# Altium PCB PCB1.pcbdoc
Units mil, origin at the board's own origin, x right, y up, seen from the top; angles counter-clockwise.
Board outline 4043.02 x 4459.39 mil, 2 copper layers (Top Layer, Bottom Layer), stack 62.206 mil thick; 106 components, 60 nets, 312 pads, 238 vias.
Unrouted connection lines stored in the file: 5.
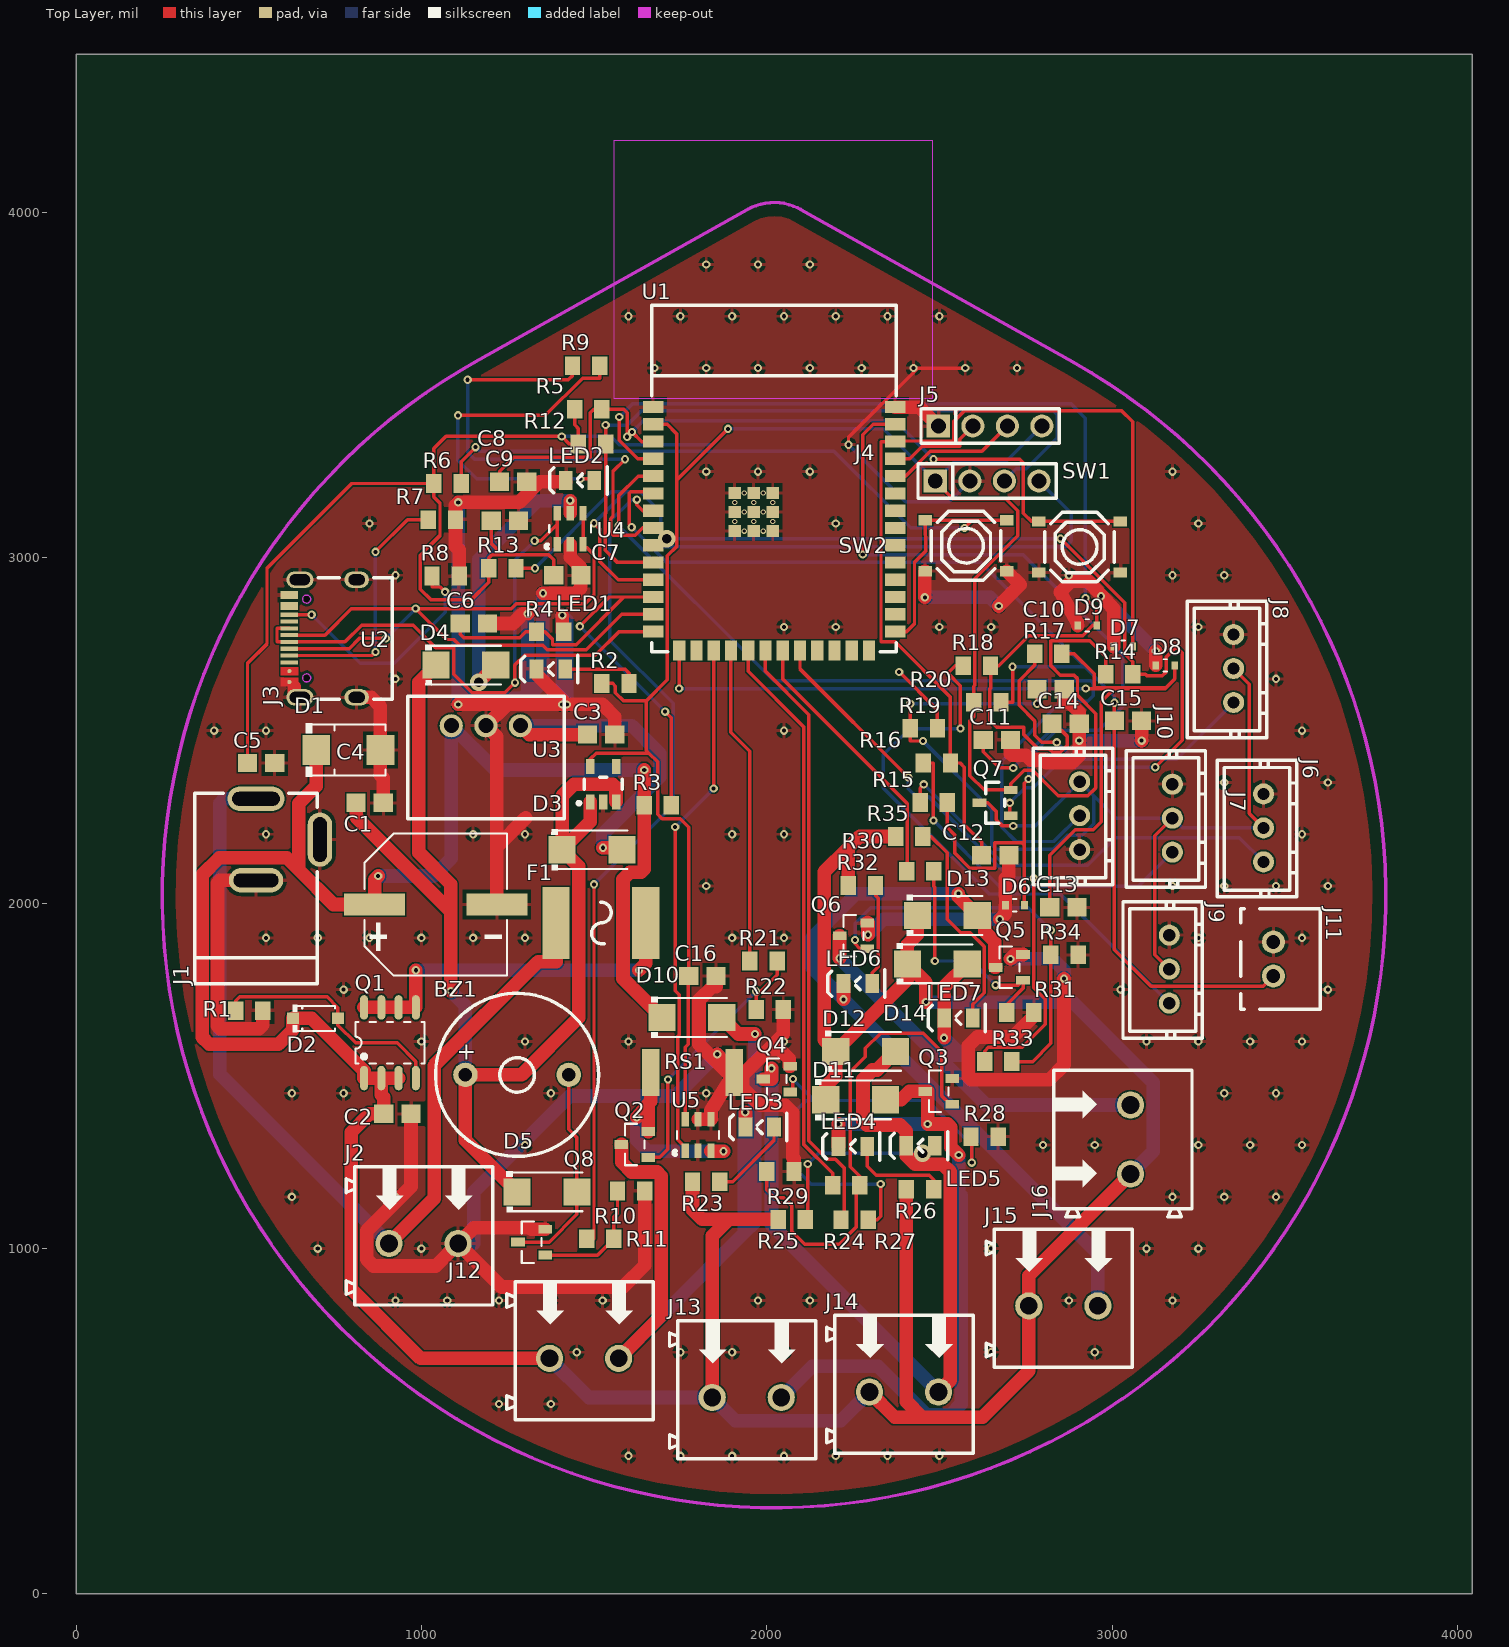
[diagram p0: Top Layer view]
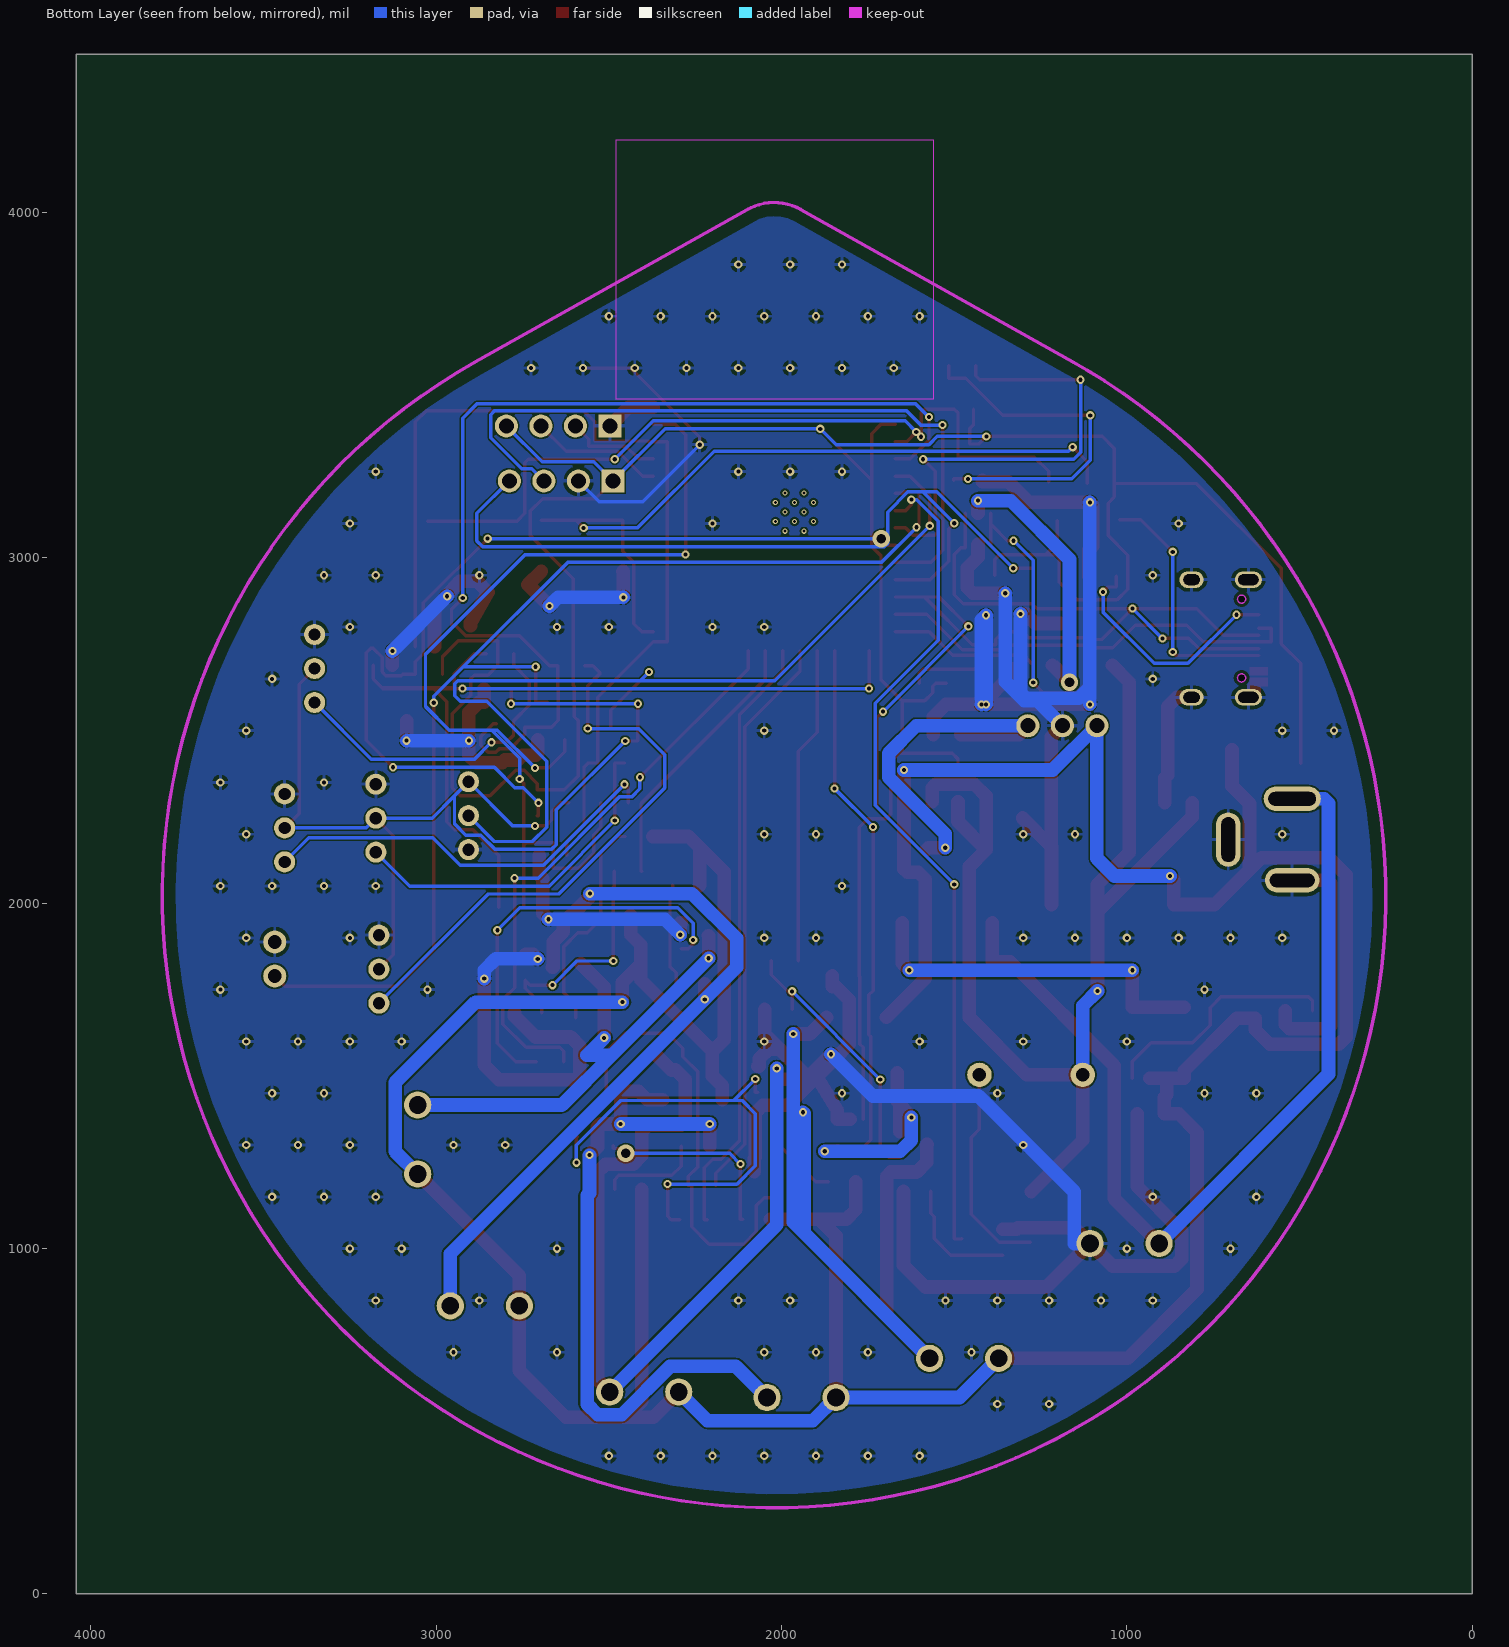
[diagram p1: Bottom Layer view, seen from below]

## Layer stack, top to bottom
Top Solder Mask Layer: solder mask 0.394, Dk 3.3
Top Layer: signal copper 1.379
Dielectric1: surface 59.449, FR4, Dk 4.5
Bottom Layer: signal copper 1.378
Bottom Solder Mask Layer: solder mask 0.394, Dk 3.3

## Board outline
4043.02,0 0,0 0,4459.39 4043.02,4459.39

## Design rules (kind name [scope] priority, off if disabled: settings)
BoardOutlineClearance copperThickness2oz_1 [All] p1 off: gap=7.99 ignorepadtopadclearanceinfootprint=FALSE except(0: Arc-SplitContinuation Track-SplitContinuation SMDPad-SplitContinuation THPad-SplitContinuation Via-SplitContinuation Fill-SplitContinuation Poly-SplitContinuation Region-SplitContinuation Text-SplitContinuation Hole-SplitContinuation; 5.98: Arc-CutoutEdge SMDPad-CutoutEdge THPad-CutoutEdge Via-CutoutEdge Fill-CutoutEdge Region-CutoutEdge Text-CutoutEdge; 6.93: Hole-OutlineEdge Hole-CutoutEdge; 10: Poly-OutlineEdge Poly-CutoutEdge; 11.81: Arc-OutlineEdge Track-OutlineEdge Track-CutoutEdge SMDPad-OutlineEdge THPad-OutlineEdge Via-OutlineEdge Fill-OutlineEdge Region-OutlineEdge Text-OutlineEdge)
BoardOutlineClearance copperThickness1oz_1 [All] p2: gap=4.02 ignorepadtopadclearanceinfootprint=FALSE except(0: Arc-SplitContinuation Track-SplitContinuation SMDPad-SplitContinuation THPad-SplitContinuation Via-SplitContinuation Fill-SplitContinuation Poly-SplitContinuation Region-SplitContinuation Text-SplitContinuation Hole-SplitContinuation; 6: SMDPad-CutoutEdge THPad-CutoutEdge Via-CutoutEdge Fill-CutoutEdge Region-CutoutEdge Text-CutoutEdge; 6.93: Hole-OutlineEdge Hole-CutoutEdge; 10: Poly-OutlineEdge Poly-CutoutEdge; 11.8: Arc-OutlineEdge Track-OutlineEdge SMDPad-OutlineEdge THPad-OutlineEdge Via-OutlineEdge Fill-OutlineEdge Region-OutlineEdge Text-OutlineEdge; 11.81: Arc-CutoutEdge Track-CutoutEdge)
Clearance ClearanceU1_ThermalVias [InComponent('U1') vs InComponent('U1')] p1: gap=1 ignorepadtopadclearanceinfootprint=TRUE
Clearance copperThickness2oz [All] p2 off: gap=5.98 ignorepadtopadclearanceinfootprint=FALSE except(6.93: Arc-Hole Track-Hole SMDPad-Hole THPad-Hole Via-Hole Fill-Hole Region-Hole Text-Hole; 7.99: Track-Track; 10: Arc-Poly Track-Poly SMDPad-Poly THPad-Poly Via-Poly Fill-Poly Poly-Poly Poly-Region Poly-Text Poly-Hole)
Clearance copperThickness1oz [All] p3: gap=5 ignorepadtopadclearanceinfootprint=TRUE
Creepage creepage [All] p1: checkdistance=0 applytopolygonpour=TRUE
DiffPairsRouting differentialPair [All] p1: maxlimit=6 minlimit=6 mostfreqgap=6 toplayer_minwidth=5 toplayer_maxwidth=100 toplayer_prefwidth=10 bottomlayer_minwidth=5 bottomlayer_maxwidth=100 bottomlayer_prefwidth=10 maxuncoupledlength=10
HoleSize [All] p1: absolutevalues=TRUE maxlimit=250 minlimit=1 maxpercent=80.000 minpercent=20.000
HoleToHoleClearance otherClearance [All] p1: gap=11.81 allowstackedmicrovias=TRUE
Length netLength [All] p1: maxlimit=0 minlimit=0
MatchedLengths netLengthTolerance [All] p1: tolerance=1000 checknetsindiffpair=FALSE checkdiffpairvsdiffpair=TRUE checkxsignals=TRUE checkothers=TRUE
MinimumSolderMaskSliver [All] p1: minsoldermaskwidth=0
PasteMaskExpansion pasteMaskExpansion [All] p1: expansion=0
PlaneConnect innerPlane [All] p1: planeconnectstyle=Relief reliefexpansion=20 reliefentries=4 reliefconductorwidth=10 reliefairgap=10
PolygonConnect copperRegion [All] p1: connectstyle=Relief reliefconductorwidth=10 reliefentries=4 polygonreliefangle="90 Angle" airgapwidth=10
RoutingVias viaSize [All] p1: holewidth=12.01 width=24.02 viastyle="Through Hole" minholewidth=11.81 minwidth=19.68 maxholewidth=248.03 maxwidth=393.7
SolderMaskExpansion solderMaskExpansion_1 [IsVia] p1: expansion=-1000 istentingtop=TRUE
SolderMaskExpansion solderMaskExpansion [All] p2: expansion=2 istentingtop=FALSE
Width copperThickness2oz_2 [All] p1 off: maxlimit=100 minlimit=8 preferedwidth=10
Width power [(InNet('+5V') OR InNet('GND') OR InNet('+12V') OR InNet('+5V_REG') OR InNet('VBUS') OR InNet('OUT_PUMP') OR InNet('OUT_V1') OR InNet('OUT_V2') OR InNet('OUT_V3') OR InNet('OUT_V4') OR InNet('VIN_RAW') OR InNet('VIN_F') OR InNet('PUMP_SRC'))] p2: maxlimit=100 minlimit=23.6 preferedwidth=39.4
Width copperThickness1oz_2 [All] p3: maxlimit=100 minlimit=5 preferedwidth=10
24 further rules are at their usual default settings.

## Components (designator, comment, footprint, x,y, rotation, side; value= is the part's Value field where it differs from the comment)
BZ1 "2.4kHz" BUZ-TH_BD12.0-P7.60-D0.6-FD 1277.3,1503.2 r0 top
C1 "470uF" CAP-SMD_BD10.0-L10.3-W10.3-LS11.0-FD 1041.71,1996.53 r0 top
C2 "10uF" C0805 930.69,1390.4 r0 top
C3 "10uF" C0805 1520.88,2488.66 r0 top
C4 "1uF" C0805 850.54,2291.1 r0 top
C5 "10uF" C0805 535.99,2406.18 r0 top
C6 "100nF" C0805 1152.07,2810.16 r0 top
C7 "10uF" C0805 1422.6,2949.81 r0 top
C8 "100nF" C0805 1241.57,3108.09 r0 top
C9 "1uF" C0805 1266.07,3220.66 r0 top
C10 "100nF" C0805 2822.49,2619.99 r0 top
C11 "100nF" C0805 2666.65,2473.12 r0 top
C12 "100nF" C0805 2661.86,2139.08 r0 top
C13 "100nF" C0805 2858.89,1988.44 r0 top
C14 "100nF" C0805 2865.92,2519.62 r0 top
C15 "100nF" C0805 3046.42,2528.3 r0 top
C16 "100nF" C0805 1813.85,1789.4 r0 top
D1 "SMBJ15A" SMB_L4.6-W3.6-LS5.3-RD 788.43,2444 r0 top
D2 "BZT52C12-WH-SOD-123" SOD-123_L2.7-W1.7-LS3.8-RD 693.36,1666.64 r0 top
D3 "SS14 SMA" SMA_L4.3-W2.6-LS5.1-RD 1494.25,2155.26 r0 top
D4 "SS14 SMA" SMA_L4.3-W2.6-LS5.1-RD 1129.05,2689.77 r0 top
D5 "SS14 SMA" SMA_L4.3-W2.6-LS5.1-RD 1363.72,1164.5 r0 top
D6 "ESD5Z3.3T1G" SOD-523_L1.2-W0.8-LS1.6-FD 2718.81,1994.42 r0 top
D7 "ESD5Z3.3T1G" SOD-523_L1.2-W0.8-LS1.6-FD 3032.62,2743.29 r0 top
D8 "ESD5Z3.3T1G" SOD-523_L1.2-W0.8-LS1.6-FD 3154.29,2689.09 r0 top
D9 "ESD5Z3.3T1G" SOD-523_L1.2-W0.8-LS1.6-FD 2928.15,2804.64 r0 top
D10 "SS34" SMA_L4.3-W2.6-LS5.2-RD 1783.17,1669.61 r0 top
D11 "SS34" SMA_L4.3-W2.6-LS5.2-RD 2257.73,1430.96 r0 top
D12 "SS34" SMA_L4.3-W2.6-LS5.2-RD 2286.7,1571.31 r0 top
D13 "SS34" SMA_L4.3-W2.6-LS5.2-RD 2522.92,1965.01 r0 top
D14 "SS34" SMA_L4.3-W2.6-LS5.2-RD 2493.95,1824.66 r0 top
F1 "BSMD2920-400-24V" F2920 1520.03,1943.17 r0 top
J1 "DC-005-5A-2.0" DC-IN-TH_DC-005-5A-2.0 613.82,2184.64 r90 top
J2 "WJ500V-5.08-2P" CONN-TH_2P-P5.00_WJ500V-5.08-2P 1006.51,1014.9 r0 top
J3 "TYPE-C-31-M-12" USB-C_SMD-TYPE-C-31-M-12_1 715.31,2766.8 r90 top
J4 "PZ254V-11-04P" HDR-TH_4P-P2.54-V-M 2638.17,3222.93 r0 top
J5 "PZ254V-11-04P" HDR-TH_4P-P2.54-V-M 2646.92,3382.26 r0 top
J6 "B3B-XH-A(LF)(SN)" CONN-TH_3P-P2.50_A2501WV2-3P 3438.83,2218.36 r270 top
J7 "B3B-XH-A(LF)(SN)" CONN-TH_3P-P2.50_A2501WV2-3P 3174.76,2246.51 r270 top
J8 "B3B-XH-A(LF)(SN)" CONN-TH_3P-P2.50_A2501WV2-3P 3352.06,2679.83 r270 top
J9 "B3B-XH-A(LF)(SN)" CONN-TH_3P-P2.50_A2501WV2-3P 3165.88,1809.34 r270 top
J10 "B3B-XH-A(LF)(SN)" CONN-TH_3P-P2.50_A2501WV2-3P 2906.33,2253.74 r270 top
J11 "B2B-XH-A(LF)(SN)" CONN-TH_B2B-XH-A-LF-SN 3467.45,1838.75 r270 top
J12 "WJ500V-5.08-2P" CONN-TH_2P-P5.00_WJ500V-5.08-2P 1471.36,682.24 r0 top
J13 "WJ500V-5.08-2P" CONN-TH_2P-P5.00_WJ500V-5.08-2P 1942.19,569.15 r0 top
J14 "WJ500V-5.08-2P" CONN-TH_2P-P5.00_WJ500V-5.08-2P 2397.67,585.05 r0 top
J15 "WJ500V-5.08-2P" CONN-TH_2P-P5.00_WJ500V-5.08-2P 2859.1,834.3 r0 top
J16 "WJ500V-5.08-2P" CONN-TH_2P-P5.00_WJ500V-5.08-2P 3053.58,1316.11 r90 top
LED1 "KT-0805G" LED0805-R-RD 1374.9,2678.51 r0 top
LED2 "KT-0805G" LED0805-R-RD 1459.93,3224.85 r0 top
LED3 "KT-0805G" LED0805-R-RD 1979.89,1351.88 r0 top
LED4 "KT-0805G" LED0805-R-RD 2249.38,1296.26 r0 top
LED5 "KT-0805G" LED0805-R-RD 2445.92,1298.02 r0 top
LED6 "KT-0805G" LED0805-R-RD 2263.9,1767.54 r0 top
LED7 "KT-0805G" LED0805-R-RD 2555.03,1667.95 r0 top
Q1 "AO4407A" SOIC-8_L4.9-W3.9-P1.27-LS6.0-BL 909.03,1596.16 r0 top
Q2 "AO3400A" SOT-23-3_L2.9-W1.3-P1.90-LS2.4-BR 1618.02,1301.56 r0 top
Q3 "AO3400A" SOT-23-3_L2.9-W1.3-P1.90-LS2.4-BR 2498.37,1455.54 r0 top
Q4 "AO3400A" SOT-23-3_L2.9-W1.3-P1.90-LS2.4-BR 2029.25,1490.92 r0 top
Q5 "AO3400A" SOT-23-3_L2.9-W1.3-P1.90-LS2.4-BR 2702.96,1814.48 r0 top
Q6 "AO3400A" SOT-23-3_L2.9-W1.3-P1.90-LS2.4-BR 2251.28,1905.89 r0 top
Q7 "AO3401A" SOT-23_L2.9-W1.3-P1.90-LS2.4-BR 2661.57,2291.1 r0 top
Q8 "AO3400A" SOT-23-3_L2.9-W1.3-P1.90-LS2.4-BR 1319.33,1018.89 r0 top
R1 "10kΩ" R0805 501.78,1689.04 r0 top
R2 "1kΩ" R0805 1562.06,2636.85 r0 top
R3 "100kΩ" R0805 1684.81,2283.67 r0 top
R4 "22kΩ" R0805 1372.72,2786.37 r0 top
R5 "10kΩ" R0805 1483.48,3431.03 r0 top
R6 "10kΩ" R0805 1075.78,3215.75 r0 top
R7 "5.1kΩ" R0805 1059.43,3110.84 r0 top
R8 "5.1kΩ" R0805 1070.33,2947.59 r0 top
R9 "1kΩ" R0805 1477.06,3556.74 r0 top
R10 "100Ω" R0805 1517.95,1028.33 r0 top
R11 "100kΩ" R0805 1607.37,1166.65 r0 top
R12 "4.7kΩ" R0805 1494.25,3330.1 r0 top
R13 "4.7kΩ" R0805 1234.69,2970.41 r0 top
R14 "100kΩ" R0805 3021.13,2663.28 r0 top
R15 "1kΩ" R0805 2483.78,2291.73 r0 top
R16 "1kΩ" R0805 2492.86,2406.32 r0 top
R17 "1kΩ" R0805 2815.39,2722.74 r0 top
R18 "1kΩ" R0805 2608.85,2688.04 r0 top
R19 "4.7kΩ" R0805 2455.19,2506.7 r0 top
R20 "10kΩ" R0805 2639.22,2582.18 r0 top
R21 "100Ω" R0805 1990.91,1833.09 r0 top
R22 "100kΩ" R0805 2008.66,1692.5 r0 top
R23 "10kΩ" R0805 1824.59,1194.12 r0 top
R24 "100Ω" R0805 2230.24,1183.48 r0 top
R25 "100kΩ" R0805 2039.69,1223.27 r0 top
R26 "10kΩ" R0805 2443.88,1172.36 r0 top
R27 "100Ω" R0805 2254.66,1083.82 r0 top
R28 "100kΩ" R0805 2630.99,1324.13 r0 top
R29 "10kΩ" R0805 2072.52,1084.66 r0 top
R30 "100Ω" R0805 2444.74,2092.95 r0 top
R31 "100kΩ" R0805 2734.01,1683.69 r0 top
R32 "10kΩ" R0805 2275.72,2051.76 r0 top
R33 "100Ω" R0805 2670.4,1541.68 r0 top
R34 "100kΩ" R0805 2862.35,1850.79 r0 top
R35 "10kΩ" R0805 2412.71,2193.44 r0 top
RS1 "20mΩ" R2512 1785.29,1509.7 r0 top
SW1 "TS-1187A-B-A-B" SW-SMD_4P-L5.1-W5.1-P3.70-LS6.5-TL_H1.5 2906.27,3031.95 r0 top
SW2 "TS-1187A-B-A-B" SW-SMD_4P-L5.1-W5.1-P3.70-LS6.5-TL_H1.5 2577.26,3035.58 r0 top
U1 "2.4GHz" WIFIM-SMD_ESP32-S3-WROOM-1-N8 2021.51,3084.5 r0 top
U2 "K7805-1000R3" PWRM-TH_K78XX-2000 1186.69,2514.3 r0 top
U3 "AP2112K-3.3TRG1" SOT-25-5_L2.9-W1.6-P0.95-LS2.8-BL 1526.41,2345.06 r0 top
U4 "USBLC6-2SC6" SOT-23-6_L2.9-W1.6-P0.95-LS2.8-BL 1430.96,3084.5 r0 top
U5 "INA181A2IDBVR" SOT-23-6_L2.9-W1.6-P0.95-LS2.8-BL 1801.33,1328.92 r0 top

## Footprints (in the part's own frame and the unit in brackets; to place one, negate y for a bottom-side part, rotate by r counter-clockwise, add the part's x,y. Pads: shape width x height; smd on the part's side, far side on the other; paste and mask are expansions set on the pad)
BUZ-TH_BD12.0-P7.60-D0.6-FD [mm]
  round 1.8 hole 1: 1(-3.8,0) 2(3.8,0)
  silkscreen extent -6,-6 6,6
C0805 [mm]
  rect 1.41x1.35 smd paste-100 mask+0.051: 1(-1,0) 2(1,0)
CAP-SMD_BD10.0-L10.3-W10.3-LS11.0-FD [mm]
  rect 4.5x1.65 smd: 1(-4.5,0) 2(4.5,0)
  silkscreen extent -5.23,-5.23 5.23,5.23
CONN-TH_2P-P5.00_WJ500V-5.08-2P [mm]
  round 2 hole 1.3: 1(-2.54,0) 2(2.54,0)
  silkscreen extent -5.68,-4.52 5.08,5.64
CONN-TH_3P-P2.50_A2501WV2-3P [mm]
  round 1.55 hole 0.9: 1(-2.5,0) 2(0,0) 3(2.5,0)
  silkscreen extent -4.97,-3.4 5.08,2.44
CONN-TH_B2B-XH-A-LF-SN [mm]
  round 1.7 hole 1: 1(1.25,0) 2(-1.25,0)
  silkscreen extent -3.68,-2.41 3.68,3.43
DC-IN-TH_DC-005-5A-2.0 [mm]
  oval 1.8x4.2 hole 1 slot 3.5 at 90 deg: 1(3,2.352)
  oval 1.8x4 hole 1 slot 3.3 at 90 deg: 2(-3,2.352)
  oval 4x1.8 hole 1 slot 3.3 at 0 deg: 3(0,-2.352)
  silkscreen extent -10.6,-2.15 3.4,6.85
F2920 [mm]
  rect 2x5.3 smd: 1(-3.3,0) 2(3.3,0)
  silkscreen extent -0.69,-1.54 0.76,1.52
HDR-TH_4P-P2.54-V-M [mm]
  rect 1.7x1.7 hole 1.1: 1(-3.81,0)
  round 1.7 hole 1.1: 2(-1.27,0) 3(1.27,0) 4(3.81,0)
  silkscreen extent -5.08,-1.27 5.08,1.27
LED0805-R-RD [mm]
  rect 1x1.4 smd: 1(1.05,0) 2(-1.05,0)
  silkscreen extent -2.22,-1.02 1.99,1.01
PWRM-TH_K78XX-2000 [mm]
  round 1.7 hole 1.1: 1(-2.54,0) 2(0,0) 3(2.54,0)
  silkscreen extent -5.74,-6.86 5.77,2.16
R0805 [mm]
  rect 1.133x1.377 smd paste-100 mask+0.051: 1(-1,0) 2(1,0)
R2512 [mil]
  rect 50.49x136.06 smd paste-3937.01 mask+2: 1(-120.72,0) 2(120.72,0)
SMA_L4.3-W2.6-LS5.1-RD [mm]
  rect 2x2 smd: 1(-2.2,0) 2(2.2,0)
  silkscreen extent -2.98,-1.5 2.6,1.5
SMA_L4.3-W2.6-LS5.2-RD [mm]
  rect 2x2 smd: 1(-2.2,0) 2(2.2,0)
  silkscreen extent -2.98,-1.5 2.6,1.5
SMB_L4.6-W3.6-LS5.3-RD [mil]
  rect 80.61x86.31 smd: 1(-92.94,0) 2(92.94,0)
  silkscreen extent -123,-77 108,77
SOD-123_L2.7-W1.7-LS3.8-RD [mm]
  rect 0.91x0.84 smd: 1(-1.655,0) 2(1.655,0)
  silkscreen extent -1.65,-1 1.43,1
SOD-523_L1.2-W0.8-LS1.6-FD [mm]
  rect 0.5x0.6 smd: 1(-0.7,0) 2(0.7,0)
  silkscreen extent -0.13,-0.45 0.13,0.45
SOIC-8_L4.9-W3.9-P1.27-LS6.0-BL [mm]
  oval 0.588x1.8 smd paste+0 mask+0.051: 1(-1.905,-2.6) 2(-0.635,-2.6) 3(0.635,-2.6) 4(1.905,-2.6) 5(1.905,2.6) 6(0.635,2.6) 7(-0.635,2.6) 8(-1.905,2.6)
  silkscreen extent -2.53,-1.52 2.53,1.52
SOT-23-3_L2.9-W1.3-P1.90-LS2.4-BR [mm]
  rect 1x0.65 smd: 1(1,-0.95) 2(1,0.95) 3(-1,0)
  silkscreen extent -0.73,-1.53 0.73,1.53
SOT-23-6_L2.9-W1.6-P0.95-LS2.8-BL [mil]
  rect 20.95x42.2 smd: 1(-37.4,-45.24) 2(0,-45.24) 3(37.4,-45.24) 4(37.4,45.24) 5(0,45.24) 6(-37.4,45.24)
  silkscreen extent -72,-57 61,11
SOT-23_L2.9-W1.3-P1.90-LS2.4-BR [mm]
  rect 1x0.6 smd paste+0 mask+0.051: 1(1.15,-0.95) 2(1.15,0.95) 3(-1.15,0)
  silkscreen extent -0.7,-1.5 0.7,1.5
SOT-25-5_L2.9-W1.6-P0.95-LS2.8-BL [mil]
  rect 24.5x43.5 smd: 1(-37.39,-51.18) 2(-0.02,-51.18) 3(37.39,-51.18) 4(37.39,51.18) 5(-37.39,51.18)
  silkscreen extent -75,-60 56,20
SW-SMD_4P-L5.1-W5.1-P3.70-LS6.5-TL_H1.5 [mm]
  rect 1x0.75 smd: 1(-3,1.875) 2(3,1.875) 3(-3,-1.875) 4(3,-1.875)
  silkscreen extent -2.55,-2.55 2.55,2.55
USB-C_SMD-TYPE-C-31-M-12_1 [mm]
  oval 1.2x2 hole 0.8 slot 1.5 at 90 deg paste-2539.97 mask+0.051: 1(4.325,1.706) 4(-4.325,1.706)
  oval 1.2x1.8 hole 0.8 slot 1.2 at 90 deg copper offset 0,0 paste-2539.97 mask+0.051: 2(4.325,-2.474) 3(-4.325,-2.474)
  round 0.3 smd: A1B12(-3.2,2.474) A4B9(-2.4,2.474)
  rect 0.3x1.3 smd paste-100 mask+0.051: A5(-1.25,2.474) A6(-0.25,2.474) A7(0.25,2.474) A8(1.25,2.474) B5(1.75,2.474) B6(0.75,2.474) B7(-0.75,2.474) B8(-1.75,2.474)
  rect 0.6x1.3 smd paste-100 mask+0.051: B1A12(3.2,2.474) B4A9(2.4,2.474)
  Top Layer region: -2.9,1.824 -2.9,3.124 -3.2,3.124 -3.2,3.124 -3.5,3.124 -3.5,1.824 -3.2,1.824 -3.2,1.824 -2.9,1.824
  Top Layer region: -2.1,1.824 -2.1,3.124 -2.4,3.124 -2.4,3.124 -2.7,3.124 -2.7,1.824 -2.4,1.824 -2.4,1.824 -2.1,1.824
  Board Outline Layer board cut-out: -2.9,0.906 -3.03,0.935 -3.134,1.019 -3.192,1.139 -3.192,1.272 -3.134,1.393 -3.03,1.476 -2.9,1.506 -2.9,1.506 -2.77,1.476 -2.665,1.393 -2.607,1.272 -2.607,1.139 -2.665,1.019 -2.77,0.935 -2.9,0.906 -2.9,0.906
  Board Outline Layer board cut-out: 2.9,0.906 2.77,0.935 2.665,1.019 2.607,1.139 2.607,1.272 2.665,1.393 2.77,1.476 2.9,1.506 2.9,1.506 3.03,1.476 3.134,1.393 3.192,1.272 3.192,1.139 3.134,1.019 3.03,0.935 2.9,0.906 2.9,0.906
  Board Outline Layer circle w0.003: c-2.9,1.206 r0.3
  Board Outline Layer circle w0.003: c2.9,1.206 r0.3
  Board Outline Layer region: -2.9,0.906 -3.03,0.935 -3.134,1.019 -3.192,1.139 -3.192,1.272 -3.134,1.393 -3.03,1.476 -2.9,1.506 -2.9,1.506 -2.77,1.476 -2.665,1.393 -2.607,1.272 -2.607,1.139 -2.665,1.019 -2.77,0.935 -2.9,0.906 -2.9,0.906
  Board Outline Layer region: 2.9,0.906 2.77,0.935 2.665,1.019 2.607,1.139 2.607,1.272 2.665,1.393 2.77,1.476 2.9,1.506 2.9,1.506 3.03,1.476 3.134,1.393 3.192,1.272 3.192,1.139 3.134,1.019 3.03,0.935 2.9,0.906 2.9,0.906
  Board Outline Layer region: -2.9,0.906 -2.972,0.914 -3.039,0.94 -3.099,0.981 -3.147,1.035 -3.18,1.099 -3.198,1.169 -3.198,1.242 -3.18,1.312 -3.147,1.376 -3.099,1.43 -3.039,1.471 -2.972,1.497 -2.9,1.506 -2.828,1.497 -2.761,1.471 -2.701,1.43 -2.653,1.376 -2.619,1.312 -2.602,1.242 -2.602,1.169 -2.619,1.099 -2.653,1.035 -2.701,0.981 -2.761,0.94 -2.828,0.914 -2.9,0.906
  Board Outline Layer region: 2.9,0.906 2.828,0.914 2.761,0.94 2.701,0.981 2.653,1.035 2.619,1.099 2.602,1.169 2.602,1.242 2.619,1.312 2.653,1.376 2.701,1.43 2.761,1.471 2.828,1.497 2.9,1.506 2.972,1.497 3.039,1.471 3.099,1.43 3.147,1.376 3.18,1.312 3.198,1.242 3.198,1.169 3.18,1.099 3.147,1.035 3.099,0.981 3.039,0.94 2.972,0.914 2.9,0.906
  silkscreen extent -4.47,-5.09 4.47,0.34
WIFIM-SMD_ESP32-S3-WROOM-1-N8 [mm]
  rect 1.5x0.9 smd paste+0 mask+0.05: 1(-8.9,8.955) 2(-8.9,7.685) 3(-8.9,6.415) 4(-8.9,5.145) 5(-8.9,3.875) 6(-8.9,2.605) 7(-8.9,1.335) 8(-8.9,0.065) 9(-8.9,-1.205) 10(-8.9,-2.475) 11(-8.9,-3.745) 12(-8.9,-5.015) 13(-8.9,-6.285) 14(-8.9,-7.555) 27(8.9,-7.555) 28(8.9,-6.285) 29(8.9,-5.015) 30(8.9,-3.745) 31(8.9,-2.475) 32(8.9,-1.205) 33(8.9,0.065) 34(8.9,1.335) 35(8.9,2.605) 36(8.9,3.875) 37(8.9,5.145) 38(8.9,6.415) 39(8.9,7.685) 40(8.9,8.955)
  rect 0.9x1.5 smd paste+0 mask+0.05: 15(-6.985,-8.955) 16(-5.715,-8.955) 17(-4.445,-8.955) 18(-3.175,-8.955) 19(-1.905,-8.955) 20(-0.635,-8.955) 21(0.635,-8.955) 22(1.905,-8.955) 23(3.175,-8.955) 24(4.445,-8.955) 25(5.715,-8.955) 26(6.985,-8.955)
  rect 0.9x0.9 smd: 41(-2.9,-0.165) 41(-2.9,1.235) 41(-2.9,2.635) 41(-1.499,-0.165) 41(-1.499,1.235) 41(-1.499,2.635) 41(-0.099,-0.165) 41(-0.099,1.235) 41(-0.099,2.635)
  silkscreen extent -9,-9.05 9,16.45

## Via types
v1: diameter 24, hole 12, Top Layer to Bottom Layer, tented both sides, 120 vias
v2: diameter 24.02, hole 12.01, Top Layer to Bottom Layer, tented both sides, 103 vias
v3: diameter 15.75, hole 9.8, Top Layer to Bottom Layer, tented both sides, 12 vias
v4: diameter 50, hole 28, Top Layer to Bottom Layer, tented both sides, 3 vias

## Nets (pads, with @x,y where several pads share a name; then routed paths per layer and width w, separated by ;. In a path a pad name is that pad's centre, name@x,y a point inside that pad or via, vN(x,y) a via of type N, cw(c..) or ccw(c..) an arc to the next point about the centre after c; other vN are vias at no path point)
+3V3: C5.1 C7.1 C8.1 C16.1 J4.1 J5.4 Q7.2 R2.1 R5.1 R6.1 R12.1 R13.1 R14.1 R20.1 U1.2 U3.5 U5.6 | length 9410.3
  Top Layer w10: C5.1 496.62,2694.62 553,2751 553,2970 798.75,3215.75 R6.1 ; C8.1 1202.2,3042 1234.2,3010 ; C7.1 1383.23,2994.77 1368,3010 1234.2,3010 ; R5.1 1444.11,3385.77 1454.88,3375 R12.1 1428.69,3330.1 v2(1406.79,3352) 1071.41,3352 1036.41,3317 R6.1 ; U3.5 1489.02,2418.02 1506,2435 1659,2435 ; R2.1 1554,2636.85 1562,2628.85 1562,2610 1586,2586 1651,2586 ; U1.2 1712,3387.05 1738.99,3360.05 1738.99,3224.99 ; U5.6 1763.93,1583 1773,1592.07 1773,1789.4 C16.1 1774.48,2220.52 1750,2245 1697,2245 1684,2258 1684,2410 1659,2435 ; v2(1888,3374) 1738.99,3224.99 ; J4.1 2539.1,3172 2692,3172 2727,3137 2727,3064 2603,2940 2603,2631 2599.85,2627.85 R20.1 2599.85,2540.85 2588,2529 2588,2370 2629.5,2328.5 Q7.2 2706.84,2346.84 2745.3,2385.3 2770,2385.3 2844.3,2311 2930,2311 2953,2334 2953,2549 2900,2602 2900,2651 2890,2661 2850,2661 2822,2689 2822,2759.85 2935.91,2759.85 2981.76,2714 R14.1 ; R6.1 1036.41,3176.59 1054,3159 1054,3065 997,3008 997,2910 1028.54,2878.46 1143.78,2878.46 1195.32,2930 R13.1 1195.32,3000 1205.32,3010 1234.2,3010 ; 1651,2586 1651,2443 1659,2435 ; 1651,2586 1712,2647 1712,3006.01 1738.99,3033.01 1738.99,3224.99
  Bottom Layer w10: v2(1406.79,3352) 1549.01,3352 1573,3328.01 1842.01,3328.01 v2(1888,3374) 2337.1,3374 J4.1 2543.4,3278.17 2692.83,3278.17 J5.4
+3V3_SENS: C10.1 J6.2 J7.2 J8.2 J9.2 J10.1 Q7.3 R19.1 | length 3295.5
  Top Layer w10: v2(2415.82,2578) R19.1 2415.82,2470 v2(2452.7,2470) ; Q7.3 2639.91,2291.09 2665,2266 2665,2242 2683,2224 v2(2714,2224) ; v2(2783.12,2578) C10.1 ; J9.2 3124,1851.21 3124,2195.73 J7.2 ; J8.2 3397,2634.88 3397,2260.18 J6.2
  Bottom Layer w10: v2(2415.82,2578) v2(2783.12,2578) ; v2(2452.7,2470) 2652,2270.7 2652,2170 2666,2156 2829.81,2156 2870.81,2197 2914,2197 2947,2230 2947,2311.49 ; v2(2714,2224) 2778.17,2224 J10.1 2947,2311.49 ; J6.2 3202.91,2218.35 J7.2 3011.99,2246.5 2947,2311.49
+5V: BZ1.1 C4.1 D3.1 D4.1 D5.1 U3.1 U3.3 | length 3538.4
  Top Layer w39.4: C4.1 811.17,2250 1085,1976.17 ; D4.1 993,2640.33 993,2147 1085,2055 1085,1976.17 ; v2(1085,1746) 1085,1976.17 ; D5.1 1127.69,1313.92 BZ1.1 1290,1503.2 1456,1669.2 1456,2106.9 D3.1 ; U3.1 1489.02,2236.64 D3.1 ; U3.3 1563.8,2335.2 1554,2345 1442,2345 1407.63,2310.63 D3.1
  Bottom Layer w39.4: v2(1085,1746) 1127.69,1703.31 BZ1.1
+5V_REG: C3.1 D3.2 U2.3 | length 1040.2
  Top Layer w39.4: U2.3 1312.33,2488.66 C3.1 ; v2(1526,2161.04) 1575.08,2161.04 D3.2
  Bottom Layer w39.4: U2.3 1609.7,2514.3 1690,2434 1690,2365 1526,2201 v2(1526,2161.04)
+12V: C1.1 C2.1 D1.1 D2.1 D10.1 D11.1 D12.1 D13.1 D14.1 J12.1 J13.1 J14.1 J15.1 J16.1 Q1.1 Q1.2 Q1.3 R3.1 R23.1 R26.1 R29.1 R32.1 R35.1 U2.1 | length 12128.1
  Top Layer w39.4: D1.1 695.49,2339.49 645,2289 645,2097 ; v2(875,2079) 864.55,2068.55 C1.1 745.47,1996.53 645,2097 ; Q1.3 Q1.2 ; J12.1 997.76,682.24 797,883 797,1337.4 850,1390.4 C2.1 891.32,1438 884.03,1445.29 Q1.2 ; v2(1645.44,2386) R3.1 1645.44,2099.44 1636,2090 1604,2090 1584,2070 1584,1782.16 D10.1 ; R23.1 1785.22,1112.78 1813.34,1084.66 1890,1084.66 ; J13.1 1842.19,1036.85 1890,1084.66 ; R29.1 1890,1084.66 ; D11.1 2171.12,1471.03 2200.09,1500 D12.1 ; R32.1 2236.35,2160.79 ; J14.1 2370.72,512 2450,512 ; R35.1 2269,2193.44 2236.35,2160.79 ; R26.1 2404.51,557.49 2450,512 ; D13.1 2436.31,1908.97 2407.34,1880 D14.1 ; v2(2461,1714) 2461,1771 D14.1 ; J16.1 2759.1,921.63 J15.1 2759.1,646.1 2625,512 2450,512 ; 645,2097 610,2132 415,2132 365,2082 365,1613 386,1592 586.2,1592 628.2,1634 D2.1 682.39,1666.64 834.03,1515 Q1.1 Q1.2 ; D12.1 2166.24,1605.16 2166.24,2090.68 2236.35,2160.79 ; D12.1 2407.34,1778.56 D14.1
  Bottom Layer w39.4: v2(875,2079) 1035.69,2079 1086.69,2130 U2.1 1214.99,2386 v2(1645.44,2386) ; J12.1 1484.46,569.15 J13.1 1909.34,502 2214.62,502 J14.1 ; v2(2461,1714) 2886,1714 3119,1481 3119,1281.53 J16.1
BOOT: R6.2 SW2.1 SW2.2 U1.27 | length 2281.7
  Top Layer w10: R6.2 1115.15,3279.15 v2(1157,3321) ; U1.27 2405.05,2787.05 2428,2810 2428,2988 2460,3020 SW2.1 2595.39,3109.39 ; v2(2573,3087) 2595.39,3109.39 ; SW2.2 2595.39,3109.39
  Bottom Layer w10: v2(1157,3321) 1169,3309 2195,3309 2417,3087 v2(2573,3087)
BTN_MODE: C15.1 J11.1 R20.2 U1.6 | length 3373.4
  Top Layer w10: v2(1609,3089) 1601.99,3096.01 1601.99,3187.05 1606.73,3191.78 1646.6,3191.78 1646.6,3187.05 U1.6 ; R20.2 2712,2582.18 v2(2712,2685) ; v2(3007,2581) 3007.05,2580.95 C15.1 3007.05,1865.95 3113,1760 3437.91,1760 J11.1
  Bottom Layer w10: v2(1609,3089) 1711,2987 2619.53,2987 2921.53,2685 ; v2(2712,2685) 2921.53,2685 ; v2(3007,2581) 3007,2599.53 2921.53,2685
BUZ_CTRL: R10.1 U1.7 | length 2443.7
  Top Layer w10: R10.1 1478.58,1028 1500,1028 v2(1500,2055) ; v2(1624,3169) 1624,3154 1640.95,3137.05 U1.7
  Bottom Layer w10: v2(1500,2055) 1729,2284 1729,2579 1546,2762 1546,3106 1609,3169 v2(1624,3169)
BUZ_G: Q8.1 R10.2 R11.1 | length 360.8
  Top Layer w10: Q8.1 1510.16,981.49 1557,1028.33 R10.2 1557.32,1092 1568,1102.68 R11.1
BUZ_N: BZ1.2 D5.2 Q8.3 | length 617.3
  Top Layer w10: Q8.3 1370,1018.89 1450.34,1099.23 D5.2 1450.34,1322 1426.9,1345.43 BZ1.2
CC1: J3.A5 R7.1 | length 734.8
  Top Layer w10: J3.A5 856.59,2717.59 v2(867,2728) ; v2(867,3017.84) 960,3110.84 R7.1
  Bottom Layer w10: v2(867,2728) v2(867,3017.84)
CC2: J3.B5 R8.1 | length 705.1
  Top Layer w10: J3.B5 v2(682.3,2835.7) ; R8.1 1030.96,2916 1055,2916 v2(1069,2902)
  Bottom Layer w10: v2(682.3,2835.7) 822.99,2695.01 921.01,2695.01 1069,2843 v2(1069,2902)
DHT_DATA: J10.2 R19.2 U1.5 | length 2865.6
  Top Layer w10: v2(1570.99,3093) 1570.99,3180.05 1627.99,3237.05 U1.5 ; v2(2383.56,2670) 2494.56,2559 R19.2
  Bottom Layer w10: v2(1570.99,3093) 2019.98,2644.01 2409.56,2644.01 ; v2(2383.56,2670) 2409.56,2644.01 ; J10.2 2831.62,2179.02 2722,2179.02 2680.3,2220.72 2680.3,2411.98 2853.34,2585.02 2930,2585.02 2946.01,2601.02 2946.01,2636 2938,2644.01 2409.56,2644.01
EN: C9.1 R5.2 SW1.1 SW1.2 U1.3 | length 2349.4
  Top Layer w10: C9.1 1226.71,3250.71 1268,3292 1489,3292 1489,3420.03 1500,3431.03 R5.2 1585.8,3431.03 1596,3420.83 v2(1596,3351) ; v2(1609.95,3364.95) 1637.86,3337.05 U1.3 ; v2(2483,3286) 2733,3286 2743,3276 2743,3130 2767.23,3105.77 SW1.1 SW1.2
  Bottom Layer w10: v2(1596,3351) v2(1609.95,3364.95) 1642,3397 2372,3397 v2(2483,3286)
G_PUMP: Q2.1 R21.2 R22.1 | length 808
  Top Layer w10: Q2.1 1690,1264.16 1714,1288.16 v2(1714,1489.71) ; R22.1 1969.29,1732 ; v2(1969.29,1745) 1969.29,1732 ; R21.2 2030.28,1792.99 1969.29,1732
  Bottom Layer w10: v2(1714,1489.71) v2(1969.29,1745)
G_V1: Q3.1 R24.2 R25.1 | length 1429
  Top Layer w10: R25.1 2000.32,1170 2022.32,1148 2050,1148 2073,1125 2073,1050 2110,1013 2210,1013 2260,1063 2260,1183.48 R24.2 2269.61,1209.39 2242,1237 2242,1512 2286,1556 2286,1580 2330,1624 2453,1624 2507,1570 2507,1442.14 2531,1418.14 Q3.1
G_V2: Q4.1 R27.2 R28.1 | length 1408.5
  Top Layer w10: Q4.1 2076,1453.52 v2(2076,1491) ; R27.2 2320,1083.82 2330,1093.82 v2(2330,1187) ; R28.1 2594,1324.13 v2(2594,1249)
  Bottom Layer w10: v2(2076,1491) 2138,1429 ; v2(2330,1187) 2129,1187 2076,1240 2076,1391 2114,1429 2138,1429 ; v2(2594,1249) 2594,1300 2465,1429 2138,1429
G_V3: Q5.1 R30.2 R31.1 | length 664.4
  Top Layer w10: R30.2 2484.11,2049.89 2487,2047 v2(2487,1833) ; v2(2663,1763) 2728.25,1763 Q5.1 2742.33,1753.69 2694.64,1706 R31.1
  Bottom Layer w10: v2(2487,1833) 2593,1833 v2(2663,1763)
G_V4: Q6.1 R33.2 R34.1 | length 1175
  Top Layer w10: v2(2256,1894) 2256,1882.49 2270,1868.49 Q6.1 ; R33.2 2770,1541.68 2822.98,1594.66 R34.1 v2(2822.98,1922.02)
  Bottom Layer w10: v2(2256,1894) 2256,1942 2301,1987 2758,1987 v2(2822.98,1922.02)
GND: C1.2 C2.2 C3.2 C4.2 C5.2 C6.2 C7.2 C8.2 C9.2 C10.2 C11.2 C12.2 C13.2 C14.2 C15.2 C16.2 D1.2 D6.1 D7.1 D8.1 D9.1 J1.2 J1.3 J2.2 J3.1 J3.2 J3.3 J3.4 J3.A1B12 J3.B1A12 J4.2 J5.1 J6.1 J7.1 J8.1 J9.1 J10.3 J11.2 LED1.2 LED2.2 Q3.2 Q4.2 Q5.2 Q6.2 Q8.2 R1.2 R4.2 R7.2 R8.2 R11.2 R22.2 R25.2 R28.2 R31.2 R34.2 RS1.2 SW1.3 SW1.4 SW2.3 SW2.4 U1.1 U1.40 U1.41 U2.2 U3.2 U4.2 U5.2 U5.4 U5.5 | length 14650.4
  Top Layer w10: v2(2237,3328) 2237,3350 2437,3550 v1(2575,3550)
  Top Layer w39.4: J1.2 418,2066.53 409.87,2058.4 409.87,1645.13 418,1637 530,1637 541.15,1648.15 R1.2 ; 632,2626.71 632,2596.52 J3.4 ; J3.3 854.85,2596.52 881.37,2570 D1.2 881.37,2371.55 889.91,2363 C4.2 ; C2.2 970.06,1180.01 841.46,1051.41 841.46,970 861.62,949.84 1041.46,949.84 J2.2 ; v2(1107,2576) 1248.39,2576 ; R8.2 1109.7,3023 1098.8,3033.9 R7.2 1098.8,3152.8 v2(1107,3161) 1283,3161 1343,3221 1418.58,3221 LED2.2 ; C6.2 1265.17,2810.17 1293.18,2838.18 v2(1308,2838.18) ; 1302,2247 1218.88,2163.88 ; LED1.2 1333.55,2663.45 v2(1421,2576) 1524.25,2576 1560.25,2540 C3.2 ; v2(1352,2898) 1445.97,2898 1461.97,2914 C7.2 ; Q8.2 1319,1056.29 1315.29,1060 1151.62,1060 J2.2 ; v2(1408,2576) 1248.39,2576 ; v2(1408,2834) 1408,2786.37 R4.2 ; U4.2 1430.96,3002 1462,2970.96 C7.2 ; R11.2 1646.74,951.74 1584,889 1232.41,889 J2.2 ; U5.5 U5.4 1838.73,1400.29 RS1.2@1898.51,1497.49 ; C16.2 1853.22,1758.22 1842.22,1758.22 1804,1720 1804,1592 1845.01,1551 1896.16,1499.84 RS1.2@1898.51,1497.49 ; v2(1857.01,1563) 1906.01,1514 RS1.2 RS1.2@1898.51,1497.49 ; R22.2 2048.03,1620.58 2004.45,1577 ; Q4.2 2065,1528.32 2065,1550 2038,1577 2004.45,1577 ; R25.2 2079.06,1260.58 2075.58,1264.06 2075.58,1393.47 2054.06,1415 1981,1415 RS1.2@1930,1466 ; Q6.2 2293.3,1943.29 v2(2293.3,1909) ; U1.40 2442.13,3437.05 J5.1 ; v2(2458,2886) 2458,2961.76 SW2.3 ; v2(2672,2861) 2734.06,2923.06 SW2.4 ; v2(2675,1954) 2691.25,1970.25 D6.1 2691.25,2072.01 2701.23,2082 C12.2 ; v2(2706,1839) 2718.88,1851.88 Q5.2 ; C11.2 2706.02,2434 2711.31,2428.71 2750.7,2428.71 2764.41,2415 2801,2415 2809.02,2406.98 2883.91,2406.98 2905.29,2428.36 v2(2905.29,2471) C14.2 2905.29,2553 2876.29,2582 2861,2582 2861,2619.99 C10.2 ; R31.2 2773.38,1673.74 2712.64,1613 2610,1613 2584,1587 2584,1498 2593,1489 2818,1489 2861,1532 v2(2861,1782) ; D9.1 2900.59,2812 2850,2901 2882,2933 2932,2933 v2@2970.2,2890.82 ; v2(2968.39,2889) v2@2970.2,2890.82 ; D7.1 3005.06,2852.33 2970.29,2890.72 v2@2970.2,2890.82 ; v2(3085.79,2471) C15.2 ; D8.1 v2(3126.73,2730.66) ; 1218.88,2163.88 1218,2163 1218,1996.53 C1.2 1218.88,2163.88 ; 1218.88,2163.88 1218.88,2482.11 U2.2 1248.39,2576 ; RS1.2@1898.51,1497.49 RS1.2@1930,1466 ; RS1.2@1930,1466 1930,1502.55 2004.45,1577
  Bottom Layer w10: v2(2237,3328) 2402,3163 2528.24,3163 J4.2
  Bottom Layer w39.4: J2.2 1152,1014.9 1152,1164 1430,1442 1736.01,1442 v2(1857.01,1563) ; v2(1107,2576) 1107,2626 ; v2(1107,3161) 1107,2626 ; U2.2 1259.39,2587 1297,2587 1352,2642 v2(1352,2898) ; v2(1308,2838.18) 1308,2610 1292,2594 1139,2594 1107,2626 ; v2(1408,2576) v2(1408,2834) 1421,2821 v2(1421,2576) ; v2(2293.3,1909) 2338.3,1954 v2(2675,1954) ; v2(2458,2886) 2647,2886 v2(2672,2861) ; v2(2706,1839) 2828,1839 2861,1806 v2(2861,1782) ; v2(2905.29,2471) v2(3085.79,2471) ; v2(2968.39,2889) v2(3126.73,2730.66)
  other v1: 1600,400 1750,400 1900,400 2050,400 2200,400 2350,400 2500,400 1225,550 1375,550 1450,700 1750,700 1900,700 2050,700 2650,700 2950,700 925,850 1075,850 1225,850 1375,850 1525,850 1975,850 2125,850 2875,850 3175,850 700,1000 1000,1000 2650,1000 3100,1000 3250,1000 625,1150 925,1150 3175,1150 3325,1150 3475,1150 1300,1300 2800,1300 2950,1300 3250,1300 3400,1300 3550,1300 625,1450 775,1450 1375,1450 1825,1450 3325,1450 3475,1450 1000,1600 1300,1600 1600,1600 2050,1600 3100,1600 3250,1600 3400,1600 3550,1600 775,1750 3025,1750 3625,1750 550,1900 700,1900 850,1900 1000,1900 1150,1900 1300,1900 1900,1900 2050,1900 3250,1900 3550,1900 1825,2050 3175,2050 3325,2050 3475,2050 3625,2050 550,2200 1150,2200 1300,2200 1900,2200 2050,2200 3550,2200 3325,2350 3625,2350 400,2500 550,2500 2050,2500 3550,2500 925,2650 3475,2650 2050,2800 2200,2800 2500,2800 2650,2800 3250,2800 925,2950 2875,2950 3175,2950 3325,2950 850,3100 2200,3100 3250,3100 1825,3250 1975,3250 2125,3250 3175,3250 1675,3550 1825,3550 1975,3550 2125,3550 2275,3550 2425,3550 2725,3550 1600,3700 1750,3700 1900,3700 2050,3700 2200,3700 2350,3700 2500,3700 1825,3850 1975,3850 2125,3850
  other v2: 1975,3250
LED2_A: LED2.1 R9.2 | length 1042.7
  Top Layer w10: v2(1106,3413) 1359,3413 1467,3521 1516.43,3521 R9.2 ; v2(1460,3229) 1501.28,3229 LED2.1
  Bottom Layer w10: v2(1106,3413) 1106,3283 1160,3229 v2(1460,3229)
LED_PUMP: LED3.1 R23.2 | length 244.8
  Top Layer w10: R23.2 1901.35,1194.12 2021.24,1314 LED3.1
LED_V1: LED4.1 R26.2 | length 293.6
  Top Layer w10: LED4.1 2290.73,1239 2317.73,1212 2471.25,1212 2483.25,1200 R26.2
LED_V2: LED5.1 R29.2 | length 565.9
  Top Layer w10: R29.2 2119,1084.66 v2(2119,1245.01) ; 2451,1276 2451,1282 2459,1290 2487.27,1290 LED5.1
  Bottom Layer w10: v2(2119,1245.01) 2149.99,1276 2451,1276
LED_V3: LED6.1 R32.2 | length 294.8
  Top Layer w10: LED6.1 2305.25,1799 2323,1816.75 2323,2015 2315.09,2022.91 R32.2
LED_V4: LED7.1 R35.2 | length 643.3
  Top Layer w10: R35.2 2475.56,2193.44 2523,2146 2523,1954 2562,1915 2590,1915 2630,1875 2630,1741.61 2596.39,1708 LED7.1
LED_WIFI: R9.1 U1.8 | length 1376.4
  Top Layer w10: v2(1134,3516) 1426,3516 1437.69,3527.69 R9.1 ; v2(1590,3286) 1555,3251 1555,3121 1548,3114 1548,3074 1556,3066 1619.95,3066 1641,3087.05 U1.8
  Bottom Layer w10: v2(1134,3516) 1134,3306 1154,3286 v2(1590,3286)
MOIST1: C11.1 D6.2 R15.2 U1.39 | length 3005.2
  Top Layer w10: v2(2278,3010) 2278,3357 2308.05,3387.05 U1.39 ; R15.2 2523.15,2219.85 2544,2199 2544,2146 2588,2102 2661,2102 2661,2176 2739,2176 2746.37,2168.63 ; C11.1 2627.28,2438.72 2674,2392 v2(2713.99,2392) ; D6.2 2746.37,2168.63 ; v2(2758.43,2360) 2746.37,2347.93 2746.37,2168.63
  Bottom Layer w10: v2(2278,3010) 2742,3010 3031,2721 3031,2570 2962.02,2501.02 2839.01,2501.02 ; v2(2713.99,2392) 2823.01,2501.02 2839.01,2501.02 ; v2(2758.43,2360) 2758.43,2420.44 2839.01,2501.02
MOIST2: C12.1 D7.2 R16.2 U1.38 | length 2823.2
  Top Layer w10: C12.1 2622.49,2177.51 2572,2228 2572,2394.32 2560,2406.32 R16.2 2532.23,2596.77 2372,2757 2331,2757 2331,3337.05 U1.38 2384,3337.05 2384,3338.79 2541,3338.79 2541,3394 2574,3427 3027.18,3427 3060.18,3394 D7.2
MOIST3: C13.1 D8.2 R17.2 U1.15 | length 2708.6
  Top Layer w10: v2(1746.52,2622) U1.15 ; C13.1 2819.52,2139 2893.52,2213 2946,2213 2969,2236 2969,2584 3007,2622 ; R17.2 2890,2722.74 2948,2664.74 2948,2625 3010,2625 ; v2(2924,2622) 3007,2622 ; D8.2 3181.85,2649.63 3157.22,2625 ; 3007,2622 3010,2625 ; 3007,2622 3154.22,2622 3157.22,2625 ; 3010,2625 3157.22,2625
  Bottom Layer w10: v2(1746.52,2622) v2(2924,2622)
MOIST4: C14.1 D9.2 R18.2 U1.4 | length 3067.9
  Top Layer w10: v2(1573,3408) 1573,3340.93 1626.88,3287.05 U1.4 ; C14.1 2834.38,2519.62 2871,2483 2871,2458 2850,2437 2828,2437 2818,2447 2786,2447 2743.77,2489.23 2743.77,2510 2666,2510 2646,2530 2646,2621 2648.22,2623.22 R18.2 2672,2688.04 2758.8,2774.85 2914.85,2774.85 2944.64,2804.64 D9.2 2955.71,2851.26 v2(2922.96,2884)
  Bottom Layer w10: v2(1573,3408) 1611,3446 2882,3446 2922.96,3405.04 v2(2922.96,2884)
MSIG1: J6.3 R15.1 | length 1200.3
  Top Layer w10: R15.1 2444.41,2333.99 v2(2454.84,2344.41)
  Bottom Layer w10: v2(2454.84,2344.41) 2689.25,2110 2930,2110 3010,2190 3368.76,2190 J6.3
MSIG2: J7.3 R16.1 | length 1006.9
  Top Layer w10: R16.1 2483,2406.32 v2(2483,2240)
  Bottom Layer w10: v2(2483,2240) 2673,2050 3076.69,2050 J7.3
MSIG3: J8.3 R17.1 | length 946.2
  Top Layer w10: R17.1 2776.02,2690 2731,2644.98 2731,2573.17 2776.18,2528 2776.18,2486.82 2797,2466 v2(2840,2466)
  Bottom Layer w10: v2(2840,2466) 2889,2417 3187.66,2417 J8.3
MSIG4: J9.3 R18.1 | length 1663.9
  Top Layer w10: v2(2561,2506) 2561,2630 2527.04,2663.96 2527.04,2669.08 2546,2688.04 R18.1
  Bottom Layer w10: v2(2561,2506) 2414,2506 2338,2430 2338,2334 2645,2027 2849.79,2027 J9.3
OUT_PUMP: D10.2 J12.2 LED3.2 Q2.3 | length 2376.1
  Top Layer w39.4: J12.2 1695,805.88 1695,1210 1683,1222 1608,1222 1580,1250 1580,1301.56 Q2.3 ; D10.2 1917.72,1621.66 v2(1966,1621.66) ; v2(1938,1395) 1938.54,1394.46 LED3.2
  Bottom Layer w39.4: J12.2 1935,1045.88 ; v2(1938,1395) 1935,1392 1935,1045.88 ; v2(1966,1621.66) 1966,1076.88 1935,1045.88
OUT_V1: D11.2 J13.2 LED4.2 Q3.3 | length 2063.1
  Top Layer w39.4: LED4.2 v2(2208.03,1361.03) ; D11.2 2389,1430.96 2413.58,1455.54 Q3.3 2466,1455.54 v2(2466,1361.03) 2523.97,1361.03 2533,1352 2533,1294.03 v2(2556.03,1271)
  Bottom Layer w39.4: J13.2 2132.05,659 2323,659 2463,519 2532,519 2563,550 2563,1154.11 2556.03,1161.08 v2(2556.03,1271) ; v2(2208.03,1361.03) v2(2466,1361.03)
OUT_V2: D12.2 J14.2 LED5.2 Q4.3 | length 2447.5
  Top Layer w39.4: Q4.3 2014,1490.92 v2(2014,1522) ; D12.2 2319.38,1517.38 2306.38,1517.38 2279,1490 2279,1369 2290,1358 2386,1358 2404.57,1339.43 LED5.2 2404.57,1269.43 2430,1244 2510,1244 2532,1222 2532,619.38 J14.2
  Bottom Layer w39.4: v2(2014,1522) 2014,1068.72 J14.2
  other v4: 2451,1276
OUT_V3: D13.2 J15.2 LED6.2 Q5.3 | length 2192.1
  Top Layer w39.4: v2(2222.55,1722) LED6.2 ; v2(2555,2028) 2555,2019.54 D13.2 2631.58,1942.96 2631.58,1918.05 2660.52,1889.11 2660.52,1814.48 Q5.3
  Bottom Layer w39.4: v2(2555,2028) 2259.45,2028 2130,1898.55 2130,1814.55 v2(2222.55,1722) 2959.1,985.45 J15.2
OUT_V4: D14.2 J16.2 LED7.2 Q6.3 | length 1469.4
  Top Layer w39.4: v2(2211,1841) 2211,1905.89 Q6.3 ; v2(2513.69,1610.31) LED7.2 2513.69,1757.78 D14.2
  Bottom Layer w39.4: v2(2211,1841) 2491.89,1560.11 ; v2(2513.69,1610.31) 2563.89,1560.11 2491.89,1560.11 ; J16.2 2635.89,1416.11 2491.89,1560.11
PUMP_EN: R21.1 U1.18 | length 921.7
  Top Layer w10: U1.18 1896.52,2495 1951.54,2439.97 R21.1
PUMP_ISENSE: U1.17 U5.1 | length 1510.6
  Top Layer w10: v2(1735,2221) 1735,1747 1747,1735 1747,1620 1742,1615 1742,1315.93 1763.93,1294 U5.1 ; v2(1846.52,2332.52) U1.17
  Bottom Layer w10: v2(1735,2221) v2(1846.52,2332.52)
PUMP_SRC: Q2.2 RS1.1 U5.3 | length 593.1
  Top Layer w39.4: v2(1624,1380) 1657.39,1418.83 ; Q2.2 1657.39,1418.83 ; RS1.1 1664.57,1427.18 1657.39,1420 1657.39,1418.83 ; U5.3 1838.73,1282 v2(1875,1282)
  Bottom Layer w39.4: v2(1624,1380) 1624,1314 1656,1282 v2(1875,1282)
PWR_LED_A: LED1.1 R2.2 | length 220.1
  Top Layer w10: LED1.1 1416.25,2678 1590,2678 1601.43,2666.57 R2.2
Q1_G: D2.2 Q1.4 R1.1 | length 710
  Top Layer w10: R1.1 462.41,1717.41 474,1729 727.52,1729 758.52,1698 D2.2 758.52,1647.48 810,1596 930,1596 984.03,1541.97 Q1.4
RXD0: J5.3 U1.36 | length 385.2
  Top Layer w10: U1.36 2402,3237.05 2473.74,3308.79 2623.46,3308.79 J5.3
SCL: J4.4 R13.2 U1.11 | length 2460.5
  Top Layer w10: R13.2 v2(1329,2970.41) ; v2(1500,3100.59) 1516,3084.59 1516,2991.05 1570,2937.05 U1.11
  Bottom Layer w10: v2(1329,2970.41) 1550.37,3191.78 1591.19,3191.78 ; v2(1500,3100.59) 1591.19,3191.78 ; J4.4 2882,3129.1 2882,3049.29 2865.71,3033 1702,3033 1693,3042 1693,3132.78 1634,3191.78 1591.19,3191.78
SDA: J4.3 R12.2 U1.10 | length 2119.3
  Top Layer w10: v2(1533.62,3385.01) R12.2 1533.62,3130 1533,3129.38 1533,3022 1567.95,2987.05 U1.10
  Bottom Layer w10: v2(1533.62,3385.01) 1596.83,3385.01 1638.82,3427 2830,3427 2842,3415 2842,3348 2752,3258 2723.24,3258 J4.3
SENS_PWR_N: Q7.1 R14.2 U1.9 | length 2741.4
  Top Layer w10: U1.9 1692,3037.05 v4(1710.95,3056) ; v2(2704,2291) 2704,2253.69 Q7.1 ; v2(2851,3056) 3037,2870 3037,2722.5 3060.5,2699 R14.2 3097.03,2663.28 3100.92,2659.39 3146,2659.39 3156.43,2669.82 3156.43,2712.43 3182,2738 3190,2738 3203,2725 3203,2472 v2(3125,2394)
  Bottom Layer w10: v4(1710.95,3056) v2(2851,3056) ; v2(2704,2291) 2748.25,2335.25 2772.43,2335.25 2831.18,2394 v2(3125,2394)
TXD0: J5.2 U1.37 | length 276.3
  Top Layer w10: U1.37 2414.05,3287.05 2450.79,3323.79 2558.74,3323.79 2558.74,3344.07 J5.2
USB_DN: J3.A7 J3.B7 U1.13 U4.3 U4.4 | length 2566.6
  Top Layer w10: J3.B7 791,2737.27 820.7,2766.97 v2(897,2766.97) ; J3.A7 721,2776.64 797.36,2853 ; U4.4 U4.3 1468.36,3029 1481,3029 1500,3010 1500,2894 1474,2868 1275,2868 1260,2853 v2@984,2853 ; U1.13 1579.98,2837.05 1477.2,2734.26 1364.79,2734.26 1352.05,2747 1111,2747 1094,2764 1073,2764 v2@984,2853 ; 797.36,2853 v2@984,2853 ; 797.36,2853 797.85,2853.48 v2(983.52,2853.48) v2@984,2853
  Bottom Layer w10: v2(897,2766.97) v2(983.52,2853.48)
USB_DP: J3.A6 J3.B6 U1.14 U4.1 U4.6 | length 2023.7
  Top Layer w10: J3.B6 582,2796.33 582,2756.96 J3.A6 778.96,2756.96 827,2805 976.13,2805 1041,2740.13 1093.87,2740.13 1093.87,2663.13 1147,2610 1242,2610 v2(1271,2639) 1271,2690 1299,2718 1503.95,2718 1573,2787.05 U1.14 ; v2(1328,3050) 1346,3050 1393.56,3097.56 ; U4.1 1393.56,3097.56 ; U4.6 1393.56,3097.56
  Bottom Layer w10: v2(1271,2639) 1271,2993 v2(1328,3050)
VALVE1_EN: R24.1 U1.19 | length 1649.7
  Top Layer w10: U1.19 1946.52,2671.48 2106.75,2511.25 2106.75,1302.6 2190.87,1218.47 R24.1
VALVE2_EN: R27.1 U1.20 | length 1765.3
  Top Layer w10: U1.20 1996.52,2671.48 2121.75,2546.25 2121.75,1311.96 2175,1258.71 2199.29,1258.71 2224,1234 2224,1083.82 R27.1
VALVE3_EN: R30.1 U1.21 | length 790
  Top Layer w10: U1.21 2046.52,2649.48 2407,2289 2407,2092.95 R30.1
VALVE4_EN: R33.1 U1.22 | length 1675.8
  Top Layer w10: U1.22 2096.52,2678.48 v2(2410,2365) ; R33.1 2631.03,1572.04 2642,1583.01 2740.01,1583.01 2807,1650 2807,1722 2773,1756 v2(2773,2073)
  Bottom Layer w10: v2(2410,2365) 2410,2332 2434,2308 2470.02,2308 2705.02,2073 v2(2773,2073)
VBUS: D4.2 J3.A4B9 J3.B4A9 U4.5 | length 797.8
  Top Layer w39.4: v4@1166,2640.1 D4.2 ; U4.5 v2(1430.96,3166)
  Bottom Layer w39.4: v4@1166,2640.1 1166,2996 1336,3166 v2(1430.96,3166)
  other v4: 1166,2640
VIN_F: F1.2 Q1.5 Q1.6 Q1.7 Q1.8 | length 1048.9
  Top Layer w39.4: Q1.8 Q1.7 Q1.6 Q1.5 v2(984.03,1806) ; v2(1630,1806) 1649.95,1825.95 F1.2
  Bottom Layer w39.4: v2(984.03,1806) v2(1630,1806)
VIN_RAW: F1.1 J1.1 J2.1 | length 2747.9
  Top Layer w39.4: J2.1 1037,1145.38 1037,1530 1338,1831 1390.11,1831 F1.1
  Bottom Layer w39.4: J1.1 428.75,2302.75 416,2290 416,1505.41 J2.1
VIN_SENSE: C6.1 R3.2 R4.1 U1.12 | length 1472.6
  Top Layer w10: C6.1 1112.7,2779.3 1123,2769 1284.63,2769 1302,2786.37 R4.1 1358,2786.37 1379.79,2764.58 1379.79,2749.26 1448.26,2749.26 1586.05,2887.05 ; v2(1459,2802) 1544.05,2887.05 1586.05,2887.05 ; U1.12 1586.05,2887.05 ; v2(1706,2555) 1724.18,2536.82 R3.2
  Bottom Layer w10: v2(1459,2802) v2(1706,2555)
pads on no net: J3.A8 J3.B8 U1.16 U1.23 U1.24 U1.25 U1.26 U1.28 U1.29 U1.30 U1.31 U1.32 U1.33 U1.34 U1.35 U3.4
copper on no net:
  other v3: 1934.91,3078.01 1990.03,3078.01 1907.35,3105.57 1962.47,3105.57 2017.59,3105.57 1934.91,3133.13 1990.03,3133.13 1907.35,3160.69 1962.47,3160.69 2017.59,3160.69 1934.91,3188.25 1990.03,3188.25

## Polygon pours and split planes (outlines as drawn)
GND on Bottom Layer "Bottom Layer-GND" (solid, remove dead copper, pour order 2): 2868.42,3532.65 2946.35,3486.26 3021.74,3435.85 3094.39,3381.56 3164.1,3323.55 3230.68,3261.96 3293.94,3196.98 3353.72,3128.78 3409.84,3057.54 3462.16,2983.46 3510.53,2906.74 3554.82,2827.6 3594.9,2746.25 3630.68,2662.91 3662.04,2577.81 3688.91,2491.19 3711.2,2403.28 3728.87,2314.33 3741.85,2224.57 3750.12,2134.26 3753.65,2043.63 3752.44,1952.95 3746.48,1862.45 3735.79,1772.39 3720.4,1683.02 3700.36,1594.57 3675.71,1507.29 3646.53,1421.42 3612.9,1337.19 3574.9,1254.85 3532.65,1174.6 3486.26,1096.67 3435.85,1021.28 3381.56,948.63 3323.55,878.92 3261.96,812.34 3196.98,749.08 3128.78,689.3 3057.54,633.18 2983.46,580.86 2906.74,532.49 2827.6,488.2 2746.25,448.12 2662.91,412.34 2577.81,380.98 2491.19,354.11 2403.28,331.82 2314.33,314.15 2224.57,301.17 2134.26,292.9 2043.63,289.37 1952.95,290.58 1862.45,296.54 1772.39,307.23 1683.02,322.62 1594.57,342.66 1507.29,367.31 1421.42,396.49 1337.19,430.12 1254.85,468.12 1174.6,510.37 1096.67,556.76 1021.28,607.17 948.63,661.46 878.92,719.47 812.34,781.06 749.08,846.04 689.3,914.24 633.18,985.48 580.86,1059.56 532.49,1136.28 488.2,1215.42 448.12,1296.77 412.34,1380.11 380.98,1465.21 354.11,1551.83 331.82,1639.74 314.15,1728.69 301.17,1818.45 292.9,1908.76 289.37,1999.39 290.58,2090.07 296.54,2180.57 307.23,2270.63 322.62,2360 342.66,2448.45 367.31,2535.73 396.49,2621.6 430.12,2705.83 468.12,2788.17 510.37,2868.42 556.76,2946.35 607.17,3021.74 661.46,3094.39 719.47,3164.1 781.06,3230.68 846.04,3293.94 914.24,3353.72 985.48,3409.84 1059.56,3462.16 1136.28,3510.53 1963.77,3974.94 1982.53,3983.4 2002.49,3988.47 2023.02,3990.01 2043.5,3987.95 2063.32,3982.37
GND on Top Layer "Top Layer-GND" (solid, remove dead copper, pour order 0): 2868.42,3532.65 2946.35,3486.26 3021.74,3435.85 3094.39,3381.56 3164.1,3323.55 3230.68,3261.96 3293.94,3196.98 3353.72,3128.78 3409.84,3057.54 3462.16,2983.46 3510.53,2906.74 3554.82,2827.6 3594.9,2746.25 3630.68,2662.91 3662.04,2577.81 3688.91,2491.19 3711.2,2403.28 3728.87,2314.33 3741.85,2224.57 3750.12,2134.26 3753.65,2043.63 3752.44,1952.95 3746.48,1862.45 3735.79,1772.39 3720.4,1683.02 3700.36,1594.57 3675.71,1507.29 3646.53,1421.42 3612.9,1337.19 3574.9,1254.85 3532.65,1174.6 3486.26,1096.67 3435.85,1021.28 3381.56,948.63 3323.55,878.92 3261.96,812.34 3196.98,749.08 3128.78,689.3 3057.54,633.18 2983.46,580.86 2906.74,532.49 2827.6,488.2 2746.25,448.12 2662.91,412.34 2577.81,380.98 2491.19,354.11 2403.28,331.82 2314.33,314.15 2224.57,301.17 2134.26,292.9 2043.63,289.37 1952.95,290.58 1862.45,296.54 1772.39,307.23 1683.02,322.62 1594.57,342.66 1507.29,367.31 1421.42,396.49 1337.19,430.12 1254.85,468.12 1174.6,510.37 1096.67,556.76 1021.28,607.17 948.63,661.46 878.92,719.47 812.34,781.06 749.08,846.04 689.3,914.24 633.18,985.48 580.86,1059.56 532.49,1136.28 488.2,1215.42 448.12,1296.77 412.34,1380.11 380.98,1465.21 354.11,1551.83 331.82,1639.74 314.15,1728.69 301.17,1818.45 292.9,1908.76 289.37,1999.39 290.58,2090.07 296.54,2180.57 307.23,2270.63 322.62,2360 342.66,2448.45 367.31,2535.73 396.49,2621.6 430.12,2705.83 468.12,2788.17 510.37,2868.42 556.76,2946.35 607.17,3021.74 661.46,3094.39 719.47,3164.1 781.06,3230.68 846.04,3293.94 914.24,3353.72 985.48,3409.84 1059.56,3462.16 1136.28,3510.53 1963.77,3974.94 1982.53,3983.4 2002.49,3988.47 2023.02,3990.01 2043.5,3987.95 2063.32,3982.37

## Keep-outs
Board Outline Layer:
  region: 1558.92,3461.36 1558.92,4209.39 2480.16,4209.39 2480.16,3461.36 1558.92,3461.36
  lines w10: 250,1998.88 251.87,1937.07 255.89,1875.36 262.07,1813.83 270.39,1752.56 280.84,1691.61 293.42,1631.06 308.1,1570.99 324.86,1511.47 343.7,1452.56 364.57,1394.36 387.47,1336.91 412.36,1280.3 439.21,1224.59 467.98,1169.86 498.65,1116.16 531.17,1063.56 565.51,1012.14 601.63,961.94 639.47,913.03 679,865.47 720.16,819.32 762.91,774.64 807.19,731.47 852.95,689.88 900.14,649.91 948.69,611.61 998.55,575.03 1049.65,540.21 1101.94,507.19 1155.35,476.02 1209.81,446.74 1265.27,419.37 1321.64,393.95 1378.87,370.52 1436.88,349.1 1495.6,329.71 1554.97,312.39 1614.9,297.15 1675.32,284.01 1736.17,272.98 1797.37,264.09 1858.84,257.34 1920.51,252.74 1982.3,250.29 2044.14,250 2105.95,251.87 2167.66,255.89 2229.19,262.07 2290.46,270.39 2351.41,280.84 2411.96,293.42 2472.03,308.1 2531.55,324.86 2590.46,343.7 2648.66,364.57 2706.11,387.47 2762.72,412.36 2818.43,439.21 2873.16,467.98 2926.86,498.65 2979.46,531.17 3030.88,565.51 3081.08,601.63 3129.99,639.47 3177.55,679 3223.7,720.16 3268.38,762.91 3311.55,807.19 3353.14,852.95 3393.11,900.14 3431.41,948.69 3467.99,998.55 3502.81,1049.65 3535.83,1101.94 3567,1155.35 3596.28,1209.81 3623.65,1265.27 3649.07,1321.64 3672.5,1378.87 3693.92,1436.88 3713.31,1495.6 3730.63,1554.97 3745.87,1614.9 3759.01,1675.32 3770.04,1736.17 3778.93,1797.37 3785.68,1858.84 3790.28,1920.51 3792.73,1982.3 3793.02,2044.14 3791.15,2105.95 3787.13,2167.66 3780.95,2229.19 3772.63,2290.46 3762.18,2351.41 3749.6,2411.96 3734.92,2472.03 3718.16,2531.55 3699.32,2590.46 3678.45,2648.66 3655.55,2706.11 3630.66,2762.72 3603.81,2818.43 3575.04,2873.16 3544.37,2926.86 3511.85,2979.46 3477.51,3030.88 3441.39,3081.08 3403.55,3129.99 3364.02,3177.55 3322.86,3223.7 3280.11,3268.38 3235.83,3311.55 3190.07,3353.14 3142.88,3393.11 3094.33,3431.41 3044.47,3467.99 2993.37,3502.81 2941.08,3535.83 2887.67,3567 2098.5,4009.28 2089.88,4013.77 2077.26,4019.19 2064.21,4023.49 2050.83,4026.63 2037.24,4028.6 2023.52,4029.37 2009.79,4028.95 1996.15,4027.33 1982.7,4024.53 1969.54,4020.56 1956.78,4015.47 1944.52,4009.28 1155.35,3567 1116.16,3544.37 1063.56,3511.85 1012.14,3477.51 961.94,3441.39 913.03,3403.55 865.47,3364.02 819.32,3322.86 774.64,3280.11 731.47,3235.83 689.88,3190.07 649.91,3142.88 611.61,3094.33 575.03,3044.47 540.21,2993.37 507.19,2941.08 476.02,2887.67 446.74,2833.21 419.37,2777.75 393.95,2721.38 370.52,2664.15 349.1,2606.14 329.71,2547.42 312.39,2488.05 297.15,2428.12 284.01,2367.7 272.98,2306.85 264.09,2245.65 257.34,2184.18 252.74,2122.51 250.29,2060.72 250,1998.88

## Text inside footprints (layer, text, board x,y; h text height)
BZ1: Top Silkscreen Layer "+" at 1102.3,1547.7 h50